# Altium PCB bunny_brain_D.PCBdoc (part 2 of 2)
Units mil, origin at the board's own origin, x right, y up, seen from the top; angles counter-clockwise.
Board outline 866.14 x 866.14 mil, 6 copper layers (Top Layer, GND1, SIG2/PWR, SIG1/PWR, GND2, Bottom Layer), stack 29.528 mil thick; 62 components, 94 nets, 390 pads, 189 vias.
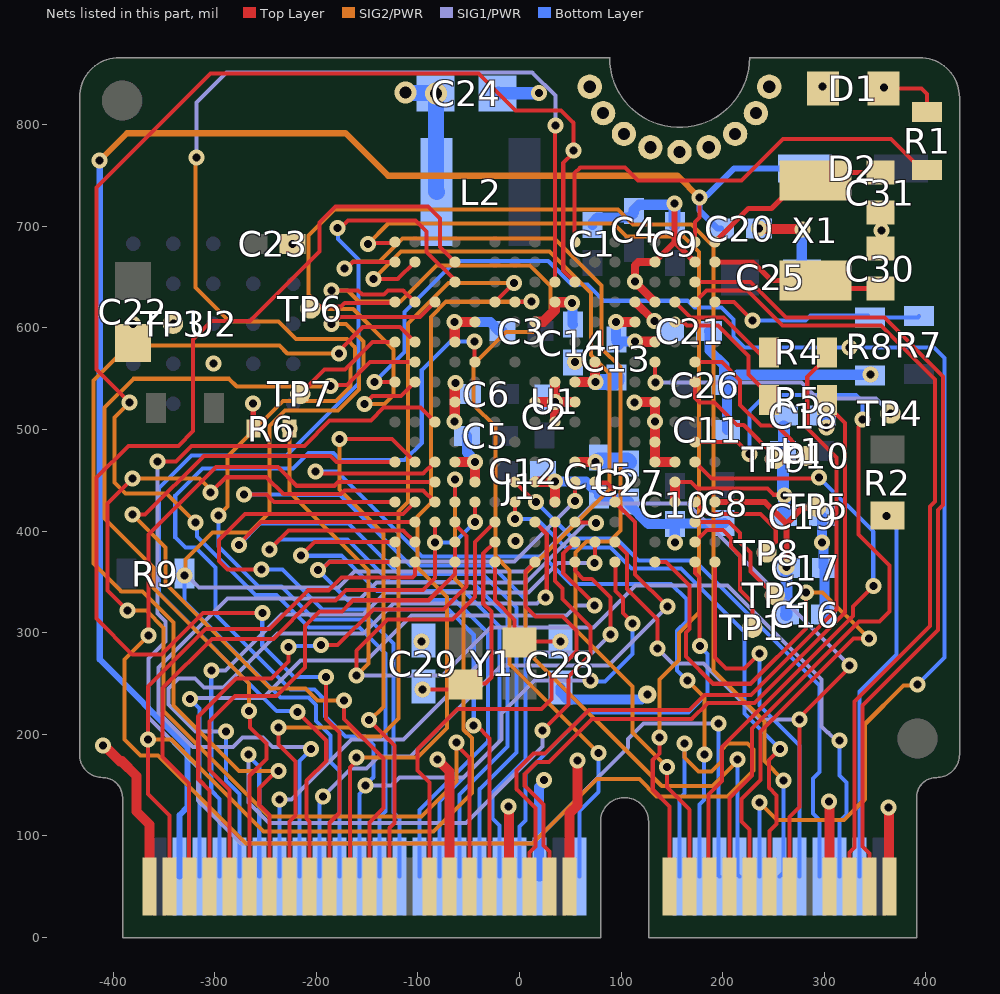
[diagram p6: the nets of this part, all layers, seen from the top]

## Via types
v1: diameter 15.75, hole 7.87, Top Layer to Bottom Layer, tented both sides, 186 vias
v2: diameter 22, hole 12, Top Layer to Bottom Layer, tented both sides, 2 vias
v3: diameter 18, hole 8, Top Layer to Bottom Layer, tented both sides, 1 vias

## Nets (pads, with @x,y where several pads share a name; then routed paths per layer and width w, separated by ;. In a path a pad name is that pad's centre, name@x,y a point inside that pad or via, vN(x,y) a via of type N, cw(c..) or ccw(c..) an arc to the next point about the centre after c; other vN are vias at no path point) (continued)
GND: C1.2 C2.1 C3.1 C4.2 C5.1 C6.1 C8.1 C9.1 C10.2 C11.1 C12.1 C13.2 C14.1 C15.1 C16.1 C17.1 C18.2 C19.1 C20.1 C21.1 C22.2 C23.2 C24.1 C25.2 C26.1 C27.1 C28.2 C29.2 C30.2 C31.2 D1.C J1.1 J1.7 J1.33 J1.36 J1.39 J1.45 J1.75 J1.SCREW R8.1 U1.D6 U1.D9 U1.D12 U1.E5 U1.E13 U1.G2 U1.H5 U1.H9 U1.H13 U1.J4 U1.J8 U1.J10 U1.J14 U1.K9 U1.N13 U1.P6 U1.P7 U1.P9 U1.P12 U1.P14 U1.P16 U1.R6 U1.T16 U2.B3 U2.C1 U2.E5 | length 2425
  Top Layer w4: v1@113.6,645.38 v1(113.6,645.57) ; U1.P14@133.28,625.51 U1.P14@133.28,625.7
  Top Layer w6: U1.P16@133.28,664.88 152.97,684.57 ; v1(152.49,722.39) 152.49,685.05 U1.T16@172.65,664.88
  Top Layer w8: v1@113.6,645.38 U1.P14@133.28,625.7 ; v1(113.6,645.57) 113.6,661.57 116.91,664.88 U1.P16@133.28,664.88
  Top Layer w10: v1(-410,189) -408.75,189 -393.2,173.45 -391.45,173.45 -377,159 -377,124.05 -364.17,111.22 J1.75@-364.17,50.2 ; v1(-223.29,682.47) -219.86,682.47 C23.2@-219.56,682.77 ; v1(-80.71,175.2) -68.9,163.39 J1.45@-68.9,50.2 ; v1(-64.2,507.77) -63.76,508.2 -63.76,526.89 U1.D9@-63.57,527.08 -63.76,527.28 -63.76,545.2 v1(-63.2,545.77) ; v1(-64.2,605.77) -63.76,605.34 -63.76,586.34 U1.D12@-63.57,586.14 ; v1@-64.06,605.63 -63.89,605.8 U1.E13@-43.91,605.8 ; U1.D6@-63.57,468.03 U1.D6@-63.57,468.03 -43.86,467.99 v1(-43.82,467.95) ; U1.E5@-43.88,448.34 v1(-43.82,467.95) ; v1(-10.9,128.89) -10.37,128.36 -10.37,50.73 J1.39@-9.84,50.2 ; U1.G2@-4.51,389.29 -4.51,389.46 v1(-3.83,390.14) ; U1.H5@15.17,448.34 15.37,448.54 34.57,448.54 v1(34.8,448.77) ; U1.H9@15.17,527.08 v1(34.86,527.08) ; U1.H13@15.17,605.83 15.37,606.02 23.32,606.02 34.66,617.36 34.66,625.31 U1.J14@34.86,625.51 35.05,625.31 51.19,625.31 v1(51.77,624.74) ; U1.J4@34.66,428.46 U1.J4@34.86,428.66 v1(34.8,448.77) ; U1.J8@34.86,507.4 v1(34.86,527.08) ; U1.J10@34.86,546.77 v1(34.86,527.08) ; J1.33@49.21,50.2 49.21,122.18 57.01,129.98 v1(57.01,174.16) ; U1.K9@54.54,527.08 v1(34.86,527.08) ; v1@94.8,604.63 95.76,605.59 v1@95.76,605.77 ; v1(94.8,605.77) v1@95.76,605.77 ; v1(113.12,526.53) 113.12,527.08 U1.P9@133.28,527.08 ; U1.N13@113.6,605.83 96.86,605.83 96.8,605.77 v1@95.76,605.77 ; v1(113.8,586.77) 114.24,586.34 133.09,586.34 U1.P12@133.28,586.14 ; U1.P9@133.28,527.08 U1.P9@133.28,527.08 ; U1.R6@152.97,468.03 U1.P6@133.28,468.03 U1.P7@133.28,487.71 v1(133.28,507.83) U1.P9@133.28,527.08 ; v1(235.8,697.77) 236.29,697.29 277.99,697.29 v1(278.47,696.8) ; v1(298.23,837.6) 299.21,836.61 D1.C@300.2,829.72 ; v1(304.8,133.77) 305.12,133.45 J1.7@305.12,50.2 ; C31.2@355.24,713.53 355.74,713.04 355.74,696.31 v1(356.23,695.82) ; v1(363.12,127.9) 363.64,127.38 363.64,50.73 J1.1@364.17,50.2
  Bottom Layer w4: C20.1@235.5,697.77 v1(235.8,697.77)
  Bottom Layer w10: v1(-380.2,603.77) U2.C1@-380.2,604.14 ; U2.B3@-301.46,564.77 v1(-301.2,564.77) ; v1(-64.2,605.77) -28.85,605.77 -19.85,596.77 C3.1@-16.9,596.77 ; C5.1@-51.9,493.77 C5.1@-51.9,493.77 -51.82,477.51 -43.82,469.51 v1(-43.82,467.95) v1@-44.25,467.52 ; C24.1@-21.69,830.77 C24.1@-20.69,831.77 ; J1.36@19.69,60.04 19.25,60.49 19.25,147.93 23.99,152.67 v1(23.99,154.84) ; v1(34.8,448.77) 34.8,448.95 65.18,448.95 ; C28.2@40.28,246.01 40.28,241.09 47.09,234.28 52.92,234.28 ; v1(51.77,624.74) 52.29,624.22 52.29,603.99 C14.1@52.8,603.47 ; 52.95,234.25 119.86,234.25 124.73,239.12 v3(125.83,239.12) ; 65.18,448.9 71.04,443.05 73.34,443.05 78.18,438.2 C15.1@78.18,435.25 81.27,432.16 104.71,432.16 C27.1@107.8,429.07 107.8,426.12 126.85,407.07 C10.2@152.8,407.07 ; C1.2@71.8,701.47 71.8,703.82 76.64,708.66 107.96,708.66 112.8,713.5 C4.2@112.8,715.17 ; v1(94.8,605.77) 94.8,588.53 C13.2@95.4,588.53 95.4,586.77 v1(113.8,586.77) v1@112.27,585.24 ; C13.2@97.8,583.39 C13.2@97.8,585.32 ; C4.2@112.16,715.81 117.64,721.29 151.39,721.29 v1(152.49,722.39) v1@152.64,722.23 ; C9.1@152.64,701.63 C9.1@152.8,701.47 ; v1(152.8,389) C10.2@152.8,407.07 ; C21.1@186.5,596.77 186.98,596.29 186.98,577.79 201.5,563.26 C26.1@201.5,543.77 204.14,541.13 C11.1@204.14,499.77 ; C8.1@201.8,408.07 201.3,407.57 153.3,407.57 C10.2@152.8,407.07 ; C26.1@204.46,543.77 214.64,553.95 344.98,553.95 v1(345.23,554.19) ; C25.2@277.83,649.77 277.83,695.01 278.47,695.65 v1(278.47,696.8) ; C19.1@297.87,414.77 297.87,388.83 v1(297.8,388.77) 299.15,387.42 299.15,365.12 C17.1@300.5,363.77 300.18,363.45 300.18,318.09 C16.1@299.87,317.77 ; C18.2@298.5,513.77 301.18,511.09 301.18,502.95 v1(302.18,501.95)
  Bottom Layer w12: C24.1@-20.69,831.77 -19.8,830.88 18.89,830.88 v1(19,831) ; C9.1@152.64,701.63 v1@152.64,722.23
  other v1: -96.53,291.29
NetC28_1: C28.1 U1.F1 Y1.3 | length 126.5
  Top Layer w4: U1.F1@-24.2,369.6 -24.2,332.15 -4.74,312.69 -4.74,299.9 Y1.3@0.91,294.24 ; Y1.3@-0.07,290.31 0.91,291.29 v1(40.28,291.29)
NetC29_1: C29.1 U1.F2 Y1.1 | length 221.3
  Top Layer w4: v1(-95.54,243.95) -58.24,243.95 -61,250 -52.24,249.95 -33.54,249.95 -27.63,255.86 -27.63,320.82 -35.71,328.9 -35.71,377.78 U1.F2@-24.2,389.29
NetC30_1: C30.1 U1.U16 X1.2 | length 230.6
  Top Layer w4: X1.2@299.14,638.73 X1.2@301.05,636.82
  Top Layer w5: U1.U16@192.34,664.88 229.68,664.88 247.96,646.6 X1.2@291.27,646.6 299.14,638.73 C30.1@355.24,638.73 X1.2@301.05,638.73
NetC31_1: C31.1 U1.U17 X1.1 | length 191.2
  Top Layer w5: U1.U17@192.34,684.57 225.24,717.47 247.96,717.47 275.52,745.03 X1.1@291.27,745.03 299.14,752.9 C31.1@355.24,752.9
NetD1_A: D1.A R1.1 | length 65.3
  Top Layer w4: D1.A@358.27,835.63 395.67,835.63 401.24,830.06 R1.1@401.24,812.49 ; D1.A@358.74,834.17 v1(358.74,836.63)
NetJ1_4: J1.4 R2.1 | length 373.9
  Bottom Layer w4: J1.4@334.65,60.04 334.65,242.16 370.99,278.49 370.99,404.93 v1(361.13,414.79)
NetR4_2: R4.2 U1.R14 | length 119
  Top Layer w4: U1.R14@152.97,625.51 168.29,610.19 200.72,610.19 237.6,573.3 249.59,573.3 R4.2@250.12,572.77
NetR5_2: R5.2 U1.R13 | length 138
  Top Layer w4: U1.R13@152.97,605.83 161.34,605.83 164.98,602.19 195.38,602.19 225.18,572.39 225.18,554.35 237.79,541.73 237.79,536.79 R5.2@245.64,528.95
NetR6_2: R6.2 U2.A4 | length 25.1
  Top Layer w4: v1@-262.04,525.61 v1@-261.91,525.49
  Top Layer w5: v1(-262.2,525.77) -262.04,525.61 -262.04,501.09 R6.2@-261.88,500.94
NetR7_1: R7.1 R8.2 U1.U14 | length 211.7
  Top Layer w4: U1.U14@192.34,625.51 211.1,625.51 v1(229.33,607.28)
  Bottom Layer w4: v1(229.33,607.28) 281.5,607.28 286.42,612.2 342.91,612.2 R8.2@344.8,610.31 392,610.31 R7.1@393.18,611.49
NetTP1_1: TP1.1 U1.T2 | length 140.4
  Top Layer w4: U1.T2@172.65,389.29 184.34,400.97 200.18,400.97 208.18,392.97 208.18,384.76 217.18,375.76 217.18,341.95 229.18,329.95 TP1.1@229.18,304.95
NetTP2_1: TP2.1 U1.T3 | length 124.5
  Top Layer w4: U1.T3@172.65,408.97 206.16,408.97 217.18,397.95 217.18,388.95 227.18,378.95 227.18,360.32 250.55,336.95 TP2.1@251.18,336.95
NetTP3_1: TP3.1 U2.C2 | length 0.7
  Top Layer w5: v1(-340.62,604.28) -340.2,604.71 TP3.1@-340.2,604.77
NetTP4_1: TP4.1 U1.P11 | length 264.7
  Top Layer w4: U1.P11@133.28,566.45 133.28,546.71 v1(133.79,546.21) ; TP4.1@365.09,515.7 365.09,515.86 v1(365.18,515.95)
  SIG1/PWR w4: v1(133.79,546.21) 277.49,546.21 293.24,530.46 350.67,530.46 v1(365.18,515.95)
NetTP7_1: TP7.1 U1.A12 | length 114.4
  Top Layer w4: TP7.1@-215.82,534.95 -191.82,558.95 -171.82,558.95 -144.63,586.14 U1.A12@-122.62,586.14
NetTP8_1: TP8.1 U1.T4 | length 117.3
  Top Layer w4: U1.T4@172.65,428.66 184.34,416.97 237.16,416.97 252.18,401.95 252.18,389.26 243.18,380.26 TP8.1@243.18,378.95
NetTP9_1: TP9.1 U1.T10 | length 120.9
  Top Layer w4: U1.T10@172.65,546.77 172.65,530.97 177.09,526.53 191.86,526.53 213.95,504.43 220.7,504.43 251.18,473.95 TP9.1@251.18,470.95
P0-2: J1.16 U1.B16 | length 1075.1
  Top Layer w4: v1(-143.82,647.95) -119.87,647.95 U1.B16@-102.94,664.88
  SIG2/PWR w4: v1(-143.82,647.95) -116.62,675.15 29.46,675.15 70.18,634.42 70.18,573.4 88.68,554.9 88.68,441.06 5.83,358.22 5.83,283.17 140,149 189.75,149 214.4,173.65 v1(214.4,175.15)
  Bottom Layer w4: v1(214.4,175.15) 214.4,62.18 J1.16@216.54,60.04
P0-4/CTIMER0-MAT2: J1.32 U1.B14 | length 1023.5
  Top Layer w4: v1(-185.11,636.76) -158.8,636.76 -154.76,632.73 -133.6,632.73 -129.31,637.02 -114.45,637.02 U1.B14@-102.94,625.51
  SIG2/PWR w4: v1(-185.11,636.76) -169.06,636.76 -158.23,625.94 -117.2,625.94 -81.76,661.37 10.23,661.37 30.51,641.09 30.51,613.19 13.09,595.77 -13.5,595.77 -45.2,564.08 -45.2,524.33 -23.82,502.95 -23.82,375.45 -9.82,361.45 -9.82,269.39 v1(77.8,181.77) v1@77.8,184.95
  Bottom Layer w4: J1.32@59.06,60.04 59.06,124.71 77.8,143.45 v1(77.8,181.77)
P0-5: TP6.1 U1.A14 | length 88
  Top Layer w4: TP6.1@-208.73,621.01 -175.76,621.01 -172.04,624.73 -123.4,624.73 U1.A14@-122.62,625.51
P0-6: J1.11 J1.56 R9.1 U1.C14 U1.M2 | length 2181.9
  Top Layer w4: v1@-329.8,357.23 -329.8,358.22 v1@-327.65,360.36 ; v1(-184.82,603.95) -183.6,603.95 -176.6,610.95 -97.81,610.95 U1.C14@-83.25,625.51 ; U1.M2@93.91,389.29 105.77,377.43 105.77,342.93 135.75,312.94 v1(135.75,284.4) ; J1.11@265.75,50.2 265.75,118.73 275.52,128.5 275.52,216.47 325.01,265.97 v1(325.01,267.51)
  SIG2/PWR w4: v1@-329.8,358.22 -328.72,359.3 -328.72,372.09 -302.24,398.57 -265.82,398.57 -246.13,418.26 -246.13,503.4 -230.88,518.65 -178.74,518.65 -157.82,539.57 -157.82,556.95 -153.54,561.23 -153.54,586.61 -170.88,603.95 v1(-184.82,603.95)
  SIG1/PWR w4: v1(-329.8,356.25) -327.39,356.25 -315.63,344.49 -178.15,344.49 -162.4,360.24 5.88,360.24 72.81,427.17 165.35,427.17 v1(325.01,267.51) ; v1(135.75,284.4) 150.42,269.73 180.94,269.73 236.15,214.52 v1(275.52,214.52)
  Bottom Layer w4: R9.1@-326.14,354.56 R9.1@-329.8,358.22 v1(-329.8,356.25) -329.8,330.66 -235.18,236.05 -207.47,236.05 -200.2,228.77 -200.2,212.99 -186.1,198.89 -186.1,172.67 -177.17,163.74 J1.56@-177.17,60.04
P0-10: J1.63 U1.B12 | length 973.9
  Top Layer w4: J1.63@-246.06,50.2 -246.06,120.63 -256.2,130.77 -256.2,146.74 -239.17,163.77 v1(-237.2,163.77) ; v1(-177.82,574.95) -177.82,577.43 -154.3,600.95 -117.75,600.95 U1.B12@-102.94,586.14
  SIG2/PWR w4: v1(-237.2,163.77) -276.2,163.77 -340.62,228.2 -340.62,309.99 -371.18,340.55 -391.98,340.55 -419.36,367.94 -419.36,548.18 -384.91,582.63 -236.29,582.63 -228.62,574.95 v1(-177.82,574.95)
P0-11: J1.65 U1.B11 | length 874.7
  Top Layer w4: v1(-266.2,222.77) -265.09,221.66 -265.09,206.66 -249.2,190.77 -249.2,175.77 -265.75,159.22 J1.65@-265.75,50.2 ; v1(-185.82,542.95) -184.95,543.83 -169.95,543.83 -147.32,566.45 U1.B11@-102.94,566.45
  SIG2/PWR w4: v1(-266.2,222.77) -266.2,249.91 -360.31,344.02 -360.31,364.25 -408.54,412.47 -408.54,521.54 -380.13,549.95 -285.88,549.95 -278.32,542.39 -186.38,542.39 v1(-185.82,542.95)
P0-14: J1.54 U1.E11 U1.M1 | length 1348.1
  Top Layer w4: v1(-44.2,586.77) -44.2,566.77 U1.E11@-43.88,566.45 ; U1.M1@93.91,369.6 94.34,369.17 94.34,341.06 101.91,333.49 101.91,319.39 111.15,310.15 v1(111.15,309.01)
  SIG1/PWR w4: v1(-151.67,149.56) -126.03,149.56 -118.11,157.48 -55.14,157.48 -17.79,194.83 -17.79,220.4 14.71,252.9 v1(69.81,252.9)
  Bottom Layer w4: J1.54@-157.48,60.04 -157.48,141.34 -151.67,147.15 -151.67,149.8 -143.7,157.77 -143.7,189.27 -152.21,197.79 -171.33,197.79 -191.2,217.65 -191.2,233.4 -201.84,244.05 -225.47,244.05 -299.28,317.86 -299.28,364.12 -318.97,383.81 -328.81,383.81 -338.82,393.82 -338.82,434.95 -312,461.77 -222.89,461.77 -207.71,476.95 -183,476.95 -176,469.95 -113.02,469.95 -96.2,486.77 -96.2,558.57 -68,586.77 v1(-44.2,586.77) ; v1(69.81,252.9) 70.79,251.92 84.15,251.92 111.15,278.92 v1(111.15,309.01)
P0-16/FC0-I2C-SDA: J1.12 U1.B10 | length 1375.8
  Top Layer w4: v1(-152.82,524.95) -144.69,533.08 -116.63,533.08 U1.B10@-102.94,546.77
  SIG2/PWR w4: v1(-152.82,524.95) -132.82,524.95 -123.82,533.95 -123.82,578.95 -163.64,618.77 -193.69,618.77 -207.75,632.83 -207.75,691.01 -182.22,716.54 97.04,716.54 111.85,701.72 169.34,701.72 190.94,680.12 190.94,262.8 241.14,212.6 241.14,173.63 v1(260,154.77)
  Bottom Layer w4: J1.12@255.91,60.04 260,64.13 v1(260,154.77)
P0-17/FC0-I2C-SCL: J1.14 U1.A10 | length 1369.1
  Top Layer w4: v1(-142.82,546.95) -142.73,546.86 -122.71,546.86 U1.A10@-122.62,546.77
  SIG2/PWR w4: v1(236.22,132.87) 253.32,115.77 319.49,115.77 339.8,136.08 339.8,209.9 377.86,247.96 390.68,247.96 v1(391.73,249.02)
  Bottom Layer w4: v1(-142.82,546.95) -113.41,576.36 -113.41,615.55 -63.2,665.77 28.27,665.77 51.27,642.77 66.8,642.77 82.8,626.77 165.35,626.77 172.05,620.08 198.82,620.08 210.63,608.27 210.63,591.54 221.4,580.77 v1(324.8,580.77) 407.8,580.77 418.31,570.26 418.31,275.59 v1(391.73,249.02) ; J1.14@236.22,60.04 v1(236.22,132.87)
P0-20: J1.18 U1.C8 | length 1399.7
  Top Layer w4: v1(-356.37,468.45) -338.32,468.45 -322.82,483.95 -211.82,483.95 -186.82,508.95 -146.32,508.95 -133.67,521.6 -97.46,521.6 U1.C8@-83.25,507.4
  SIG1/PWR w4: v1(-356.37,468.45) -356.37,318.97 -348.5,311.1 -348.5,291.29 -365.23,274.56 -365.23,216.61 -316.2,167.58 -316.2,134.77 -274.2,92.77 12.77,92.77 106.8,186.8 106.8,195.38 122.19,210.77 v1(195.8,210.77)
  Bottom Layer w4: v1(195.8,210.77) 195.8,176.06 195.89,175.97 195.89,61 J1.18@196.85,60.04
P0-24/FC1-I2C-SDA: J1.51 U1.B6 | length 561
  Top Layer w4: v1(-177.2,490.77) -125.68,490.77 U1.B6@-102.94,468.03 ; v1(-148.09,213.97) -123.2,189.08 -123.2,112.77 -127.95,108.02 J1.51@-127.95,50.2
  SIG2/PWR w4: v1(-177.2,490.77) -177.2,440.86 -133.93,397.59 -133.93,227.04 -146.99,213.97 v1(-148.09,213.97)
P0-25/FC1-I2C-SCL: J1.53 U1.A6 | length 794.7
  Top Layer w4: v1(-380.98,416.29) -368.48,416.29 -310.77,474 -186.21,474 -180.24,468.03 U1.A6@-122.62,468.03 ; v1(-172.58,233.31) -172.58,215.15 -133.69,176.27 -133.69,127.27 -147.64,113.33 J1.53@-147.64,50.2
  SIG2/PWR w4: v1(-380.98,416.29) -348.5,383.81 -348.5,348.38 -245.15,245.03 -210.7,245.03 -198.98,233.31 v1(-172.58,233.31)
P1-4: J1.40 U1.A4 | length 760.4
  Top Layer w4: v1(-271.2,435.91) -248.91,435.91 -241.66,428.66 U1.A4@-122.62,428.66
  Bottom Layer w4: v1(-271.2,435.91) -222.93,435.91 -222.79,435.77 -176.91,435.77 -107.09,365.95 -27.49,365.95 5.96,332.5 5.96,175.27 -26.57,142.74 -26.57,117.13 -19.69,110.24 J1.40@-19.69,60.04
P1-5: J1.42 U1.B3 | length 779.4
  Top Layer w4: v1(-276.19,386.3) -276.19,387.22 -254.61,408.8 -103.11,408.8 U1.B3@-102.94,408.97
  Bottom Layer w4: v1(-276.19,386.3) -254.72,407.77 -168.6,407.77 -118.78,357.95 -36.22,357.95 -3.02,324.75 -3.02,182.26 -39.37,145.91 J1.42@-39.37,60.04
P1-6: J1.44 U1.B2 | length 700.7
  Top Layer w4: v1(-246.2,381.77) -227.17,400.8 -114.45,400.8 U1.B2@-102.94,389.29
  Bottom Layer w4: v1(-246.2,381.77) -236.2,391.77 -169.2,391.77 -127.38,349.95 -46.92,349.95 -11.76,314.79 -11.76,188.07 -59.06,140.77 J1.44@-59.06,60.04
P1-7: J1.46 U1.A2 | length 592.9
  Top Layer w4: v1(-215.2,375.77) -201.68,389.29 U1.A2@-122.62,389.29
  Bottom Layer w4: v1(-215.2,375.77) -175.1,375.77 -140.28,340.95 -54.65,340.95 -19.76,306.05 -19.76,192.86 -78.74,133.88 J1.46@-78.74,60.04
P1-8: J1.48 U1.A1 U1.K5 | length 840.1
  Top Layer w4: v1(-198.34,361.52) -195.16,361.52 -187.07,369.6 U1.A1@-122.62,369.6 ; U1.K5@54.54,448.34 v1(54.54,429.59) v1@55.18,428.95
  SIG1/PWR w4: v1(-198.34,361.52) -195.58,361.52 -187.15,369.95 -5.1,369.95 v1(54.54,429.59)
  Bottom Layer w4: v1(-198.34,361.52) -168.77,331.95 -63.37,331.95 -31.18,299.76 -31.18,192.75 -98.43,125.51 J1.48@-98.43,60.04
P1-9: J1.73 U1.B1 U1.D4 | length 1236.3
  Top Layer w4: J1.73@-344.49,50.2 -344.49,119.89 -365.82,141.22 v1(-365.82,194.95) -365.82,246.95 -309,303.77 -246,303.77 -208,341.77 -188,341.77 -175.24,354.53 -105.28,354.53 -102.94,356.88 U1.B1@-102.94,369.6 ; U1.D4@-63.57,428.66 v1(-63.57,450.64)
  SIG2/PWR w4: v1(-365.82,194.95) -342.59,194.95 -251.97,104.33 -84.75,104.33 -46.82,142.26 -46.82,196.32 -54.99,204.5 -54.99,344.36 -63.57,352.94 v1(-63.57,450.64)
P1-10: J1.71 U1.C3 U1.E4 | length 641.7
  Top Layer w4: J1.71@-324.8,50.2 -325.2,50.6 -325.2,151.56 -351.2,177.56 -351.2,245.57 -302.84,293.93 -242.35,293.93 -204.51,331.77 -181,331.77 -170.82,341.95 -95.08,341.95 -83.25,353.78 v1(-83.25,388.95) U1.C3@-83.25,408.97 ; v1@-43.86,408.99 U1.E4@-43.88,428.66
  Bottom Layer w4: v1(-83.25,388.95) -63.84,388.95 v1(-43.83,408.96)
P1-11: J1.69 U1.D3 | length 565.5
  Top Layer w4: J1.69@-305.12,50.2 -305.12,144.72 -316.2,155.8 -316.2,217.77 -279.2,254.77 -244.25,254.77 -227.2,271.82 v1(-227.2,285.74) ; v1(-195.2,287.77) -179,287.77 -143.82,322.95 -74.82,322.95 -52.06,345.71 -52.06,395.19 -60.57,403.7 -60.57,404.07 -63.57,407.07 U1.D3@-63.57,408.97
  Bottom Layer w4: v1(-227.2,285.74) -226.18,286.75 -196.21,286.75 v1(-195.2,287.77)
P1-12: J1.67 U1.D1 U1.D2 | length 528.2
  Top Layer w4: J1.67@-285.43,50.2 -285.43,145 -305.2,164.77 -305.2,212.77 -280.2,237.77 -238.98,237.77 -211.2,265.56 -211.2,306.8 -197,321 -174.77,321 -163.82,331.95 -89.33,331.95 -63.57,357.71 U1.D2@-63.57,389.29
P1-18: J1.13 U1.G4 | length 563.8
  Top Layer w4: U1.G4@-4.51,428.66 -4.36,428.51 -4.36,412.29 v1(-4.2,412.13) ; J1.13@246.06,50.2 246.06,104.99 252.8,111.73 252.8,139.98 245.35,147.43 245.35,174.83 v1(256.3,185.77)
  Bottom Layer w4: v1(-4.2,412.13) 17,412.13 45.36,383.77 89.66,383.77 110.36,363.06 159.07,363.06 221.38,300.75 221.38,220.69 v1(256.3,185.77)
P1-19: J1.8 U1.G5 | length 576
  Top Layer w4: U1.G5@-4.51,448.34 15.06,428.77 v1(16.35,428.77)
  Bottom Layer w4: v1(16.35,428.77) 52.4,392.72 95.35,392.72 117.01,371.06 172.07,371.06 295.28,247.86 295.28,163.11 288.8,156.64 288.8,121.94 295.28,115.46 J1.8@295.28,60.04
P1-21/MCLK: J1.58 U1.L5 U1.M4 | length 654.8
  Top Layer w4: U1.L5@74.23,448.34 74.97,447.6 85.74,447.6 93.17,440.17 93.17,429.4 113.77,408.8 113.77,357.47 v1(145.5,325.74)
  SIG1/PWR w4: v1(-193.2,138.77) -165.63,166.34 -150.59,166.34 -138.83,178.1 -107.36,178.1 -17.74,267.72 87.48,267.72 v1(145.5,325.74)
  Bottom Layer w4: J1.58@-196.85,60.04 -196.85,131.94 -193.2,135.59 v1(-193.2,138.77)
P2-1: J1.47 U1.H1 | length 477.7
  Top Layer w4: J1.47@-88.58,50.2 -88.58,152.43 -100.47,164.32 -100.47,185.31 -60.82,224.95 21.59,224.95 31.42,234.79 31.42,256.84 56.03,281.45 56.03,302.12 42.25,315.9 15.68,315.9 5.83,325.74 5.83,360.27 U1.H1@15.17,369.6
P2-2/SD-D1: J1.66 U1.H3 | length 726.8
  Top Layer w4: U1.H3@15.17,408.97 26.8,397.34 26.8,335.97 v1(25.52,334.69)
  SIG1/PWR w4: v1(-288.82,202.95) -319.09,202.95 -345.47,229.33 -345.47,245.08 -335.63,254.92 -319.24,254.92 -310.34,246.01 -291.41,246.01 -238.21,299.21 -153.54,299.21 -124.02,328.74 17.3,328.74 23.25,334.69 v1(25.52,334.69)
  Bottom Layer w4: v1(-288.82,202.95) -288.82,154.42 -275.59,141.19 J1.66@-275.59,60.04
P2-3/SD-D0: J1.64 U1.J3 | length 755.5
  Top Layer w4: v1(22.57,203.69) 48.16,229.28 48.16,256.84 69.81,278.49 69.81,305.76 42.25,333.32 42.25,343.46 34.86,350.85 U1.J3@34.86,408.97
  SIG1/PWR w4: v1(-266.82,179.95) -266.82,132.82 -246.77,112.77 -52.61,112.77 22.57,187.94 v1(22.57,203.69)
  Bottom Layer w4: v1(-266.82,179.95) -266.82,178.75 -256.2,168.12 -256.2,60.33 J1.64@-255.91,60.04
P2-4/SD-CLK: J1.60 U1.K3 | length 858.4
  Top Layer w4: U1.K3@54.54,408.97 55.14,408.37 74.84,408.37 v1(75.44,407.77)
  SIG1/PWR w4: v1(-205.2,185.77) -207.09,187.66 -243.3,187.66 -252.59,196.95 -272.54,196.95 -281.93,187.56 -321.42,187.56 -355.39,221.53 -355.39,265.58 -287.31,333.66 -156.5,333.66 -140.75,349.41 6.37,349.41 64.27,407.31 74.98,407.31 v1(75.44,407.77)
  Bottom Layer w4: J1.60@-216.54,60.04 -216.54,173.78 -205.2,185.12 v1(-205.2,185.77)
P2-5/SD-CMD: J1.62 U1.K1 | length 559.6
  Top Layer w4: U1.K1@54.54,369.6 54.54,361.03 62.6,352.97 71.12,352.97 89.5,334.6 v1(89.5,298.18)
  SIG1/PWR w4: v1(-236.2,135.77) -224.47,135.77 -165.4,194.83 -114.25,194.83 -28.57,280.51 71.83,280.51 v1(89.5,298.18)
  Bottom Layer w4: J1.62@-236.2,60.06 v1(-236.2,135.77)
P2-6/SD-D3: J1.70 U1.K2 | length 694.5
  Top Layer w4: U1.K2@54.54,389.29 43.03,377.78 43.03,358.95 73.65,328.33 v1(73.65,326.72)
  SIG1/PWR w4: v1(-324.2,234.77) -323.2,235.77 -252.44,235.77 -215.62,272.59 -150.66,272.59 -106.37,316.88 46.19,316.88 56.03,326.72 v1(73.65,326.72)
  Bottom Layer w4: v1(-324.2,234.77) -314.96,225.53 J1.70@-314.96,60.04
P2-7/SD-D2: J1.68 U1.L2 | length 647.7
  Top Layer w4: v1(73.8,368.77) 74.23,369.2 U1.L2@74.23,389.29
  SIG1/PWR w4: v1(-303.2,262.77) -289.42,262.77 -234.27,317.91 -153.54,317.91 -131.89,339.57 8.86,339.57 38.06,368.77 v1(73.8,368.77)
  Bottom Layer w4: v1(-303.2,262.77) -303.41,262.56 -303.41,245.77 -303.41,144.54 -295.2,136.33 J1.68@-295.2,60.12
P3-2/LPSPI7-MOSI: J1.59 U1.D15 | length 1038.7
  Top Layer w4: v1(-218.69,222.17) -190.2,193.68 -190.2,173.77 -209.65,154.32 -209.65,117.13 -206.69,114.17 J1.59@-206.69,50.2 ; v1(-179.34,698.57) -176.16,698.57 -168.96,705.77 -102.2,705.77 -91.43,695 -91.43,674.95 -63.57,647.1 U1.D15@-63.57,645.2
  Bottom Layer w4: v1(-218.69,222.17) -219.62,223.1 -238.97,223.1 -354.82,338.95 -354.82,442.45 -322.91,474.36 -229.38,474.36 -158.44,545.3 -158.44,667.18 -178.59,687.33 -178.59,697.83 v1(-179.34,698.57)
P3-3/LPSPI7-SCK: J1.57 U1.D16 | length 1228.9
  Top Layer w4: v1(-253.2,319.61) -311.36,319.61 -352.2,278.77 -381.2,278.77 -416.33,313.9 -416.33,452.64 -385.02,483.95 -335.82,483.95 -321.2,498.57 -321.2,588.77 -303.2,606.77 -265.3,606.77 -196.92,675.15 -196.92,703.69 -181.17,719.44 -89.87,719.44 -78.2,707.77 -78.2,679.51 U1.D16@-63.57,664.88 ; v1(-190.45,256.52) -190.45,214.93 -177.17,201.65 -177.17,122.8 -187.01,112.96 J1.57@-187.01,50.2
  Bottom Layer w4: v1(-253.2,319.61) -253.2,287.53 -222.19,256.52 v1(-190.45,256.52)
P3-4/LPSPI7-MISO: J1.61 U1.F14 | length 835.5
  Top Layer w4: v1(-237.2,206.77) -237.2,189.77 -220.47,173.04 -220.47,120.08 -226.38,114.17 J1.61@-226.38,50.2 ; U1.F14@-24.2,625.51 -24.08,625.51 -5.32,644.27 v1(-5.2,644.27)
  SIG2/PWR w4: v1(-237.2,206.77) -166.98,206.77 -158.05,197.83 -136.81,197.83 -119.09,215.55 -119.09,419.32 -109.82,428.6 -109.82,604.15 -69.7,644.27 v1(-5.2,644.27)
P3-5/LPSPI7-CS: J1.55 U1.G14 | length 774.2
  Top Layer w4: J1.55@-167.32,50.2 -166.96,50.55 -166.96,167.49 -160.28,174.17 v1(-160.28,177.35) ; U1.G14@-4.51,625.51 -4.38,625.64 11.67,625.64 v1(11.8,625.77)
  SIG2/PWR w4: v1(-160.28,177.35) -100.62,177.35 -71.57,206.4 -71.57,335.35 -100.39,364.17 -100.39,414.37 -87.2,427.57 -87.2,610.77 -72.2,625.77 v1(11.8,625.77)
P3-16/SAI1-TX-BCLK: J1.50 U1.J15 | length 1648.8
  Top Layer w4: U1.J15@34.86,645.2 35.03,645.37 35.03,798.83 v1(35.36,799.16)
  SIG2/PWR w4: v1(-317.99,767.67) -317.99,766.68 -318.97,765.7 -318.97,639.71 -285.5,606.25 -237.28,606.25 -219.98,588.95 -169.82,588.95 -161.82,580.95 -161.82,568.4 -166.34,563.88 -166.34,542.37 -180.75,527.95 -232.9,527.95 -287.47,473.38 -287.47,424.16 v1(-296.33,415.31)
  SIG1/PWR w4: v1(-317.99,767.67) -317.99,821.8 -288.24,851.55 12.5,851.55 35.36,828.69 v1(35.36,799.16)
  Bottom Layer w4: v1(-296.33,415.31) -296.33,384.78 -256.97,345.42 -234.32,345.42 -201.97,313.07 -147.84,313.07 -124.02,289.25 -124.02,123.03 -118.11,117.12 J1.50@-118.11,60.04
P3-17/SAI1-TX-FS: J1.52 U1.K15 | length 1578.2
  Top Layer w4: v1(-383.93,526.53) -416.41,559.01 -416.41,738.12 -304.13,850.39 -40.39,850.39 -4,814 41,814 53.08,801.92 v1(53.08,774.56) ; v1@52.19,775.44 v1(53.08,774.56) ; U1.K15@54.54,645.2 43.03,656.71 43.03,762.16 53.08,772.2 v1(53.08,774.56)
  SIG2/PWR w4: v1(-383.93,526.53) -398.57,511.89 -398.57,447.79 -387.74,436.96 -347.51,436.96 v1(-318.97,408.42)
  Bottom Layer w4: v1(-318.97,408.42) -317.4,406.85 -317.4,394.54 -259.86,337 -239,337 -207.07,305.07 -157.55,305.07 -132.02,279.53 -132.02,123.89 -137.8,118.11 J1.52@-137.8,60.04
P3-19/GREEN-LED: R1.2 U1.K17 | length 451.9
  Top Layer w4: U1.K17@54.54,684.57 54.3,684.81 54.3,752.27 59.8,757.77 103.8,757.77 116.54,745.03 218.43,745.03 259.35,785.95 365.62,785.95 388.32,763.25 393.4,763.25 R1.2@401.24,755.41
P4-0: J1.15 U1.P1 | length 691
  Top Layer w4: U1.P1@133.28,369.6 144.05,369.6 167.38,346.28 167.38,303.72 163.68,300.03 163.68,276.58 190.49,249.77 227.41,249.77 281.78,304.15 v1(281.78,339.49) ; J1.15@226.38,50.2 226.38,106.18 218.43,114.13 218.43,136.32 237.35,155.24 237.35,202.9 328.79,294.34 343.54,294.34 v1(343.75,294.13)
  SIG2/PWR w4: v1(281.78,339.49) 298.4,339.49 v1(343.75,294.13)
P4-2/DAC0: J1.38 U1.T1 | length 450.1
  Top Layer w4: U1.T1@172.65,369.6 172.65,358.72 177.09,354.28 177.09,287.61 v1(177.55,287.15)
  Bottom Layer w4: J1.38@0,60.04 0,109.25 5.91,115.16 5.91,161.4 65.96,221.46 166.32,221.46 184.97,240.11 184.97,278.94 177.55,286.35 v1(177.55,287.15)
P4-3/DAC1: J1.10 U1.U1 | length 384.1
  Top Layer w4: U1.U1@192.34,369.6 192.34,275.77 203.4,264.71 221.38,264.71 v1(236.15,279.48)
  Bottom Layer w4: v1(236.15,279.48) 236.15,228.42 275.59,188.98 J1.10@275.59,60.04
P4-12/FC2-RX: J1.19 U1.T6 | length 621.5
  Top Layer w4: U1.T6@172.65,468.03 188.96,451.72 293.75,451.72 v1(294.8,452.77) ; J1.19@187.01,50.2 186.18,51.03 186.18,140.95 199.18,153.95 199.18,187.36 328.18,316.36 328.18,325.95 v1(348.18,345.95)
  Bottom Layer w4: v1(294.8,452.77) 348.18,399.39 v1(348.18,345.95)
P4-13/FC2-TX: J1.17 U1.T7 | length 789.7
  Top Layer w4: U1.T7@172.65,487.71 214.42,487.71 v1(226.18,475.95) ; J1.17@206.69,50.2 206.69,137.46 228.85,159.62 228.85,205.72 334.16,311.02 354.33,311.02 364.17,320.87 364.17,365.96 333.66,396.47 333.66,502.75 337.53,506.61 v1(337.53,509.79)
  Bottom Layer w4: v1(226.18,475.95) 226.18,518.15 241.98,533.95 330.99,533.95 337.53,527.41 v1(337.53,509.79)
P4-21: TP10.1 U1.T11 | length 162.6
  Top Layer w4: U1.T11@172.65,566.45 199.17,566.45 217.18,548.45 217.18,524.32 237.55,503.95 253.18,503.95 282.18,474.95 TP10.1@282.18,473.95
PIO1-0/FC3-RX: J1.20 U1.C6 | length 833.3
  Top Layer w4: v1(-200.86,458.61) -198.76,456.52 -94.76,456.52 U1.C6@-83.25,468.03
  SIG2/PWR w4: v1(165.28,252.9) 182.01,236.17 182.01,180.16 v1(181.93,180.07)
  Bottom Layer w4: v1(-200.86,458.61) -179.48,458.61 -95.82,374.95 23.67,374.95 50.67,347.95 149.18,347.95 164.18,332.95 164.18,310.95 155.18,301.95 155.18,263.01 v1(165.28,252.9) v1@165.28,256.08 ; J1.20@177.17,60.04 177.17,130.94 181.69,135.45 181.69,179.83 v1(181.93,180.07)
PIO1-1/FC3-TX: J1.22 U1.C5 | length 1496.9
  Top Layer w4: v1(-365.23,297.2) -365.23,396.54 -298.77,463 -237.73,463 -219.39,444.66 -182.31,444.66 -178.62,448.34 U1.C5@-83.25,448.34
  SIG2/PWR w4: v1(-365.23,297.2) -388.85,273.57 -388.85,213.53 -388.85,194.85 -373.08,179.08 -355.95,179.08 -269.39,92.52 12.77,92.52 76.25,156 118,156 135,139 204.92,139 230.24,164.32 230.24,184.99 224.34,190.9 204.9,190.9 198.75,184.75 198.75,173.29 188.79,163.34 176.11,163.34 162.33,177.12 v1(162.33,190.9)
  Bottom Layer w4: J1.22@157.48,60.04 157.48,136.84 162.33,141.68 v1(162.33,190.9)
PIO1-2/CAN-TX: J1.43 U1.C4 | length 1128.5
  Top Layer w4: v1(-385.9,321.8) -405.58,341.49 -405.58,427.12 -381.07,451.63 v1(-381.07,452.03) ; v1(-304.21,437.94) -289.15,453 -248.87,453 -232.53,436.66 -175.78,436.66 -172.27,440.17 -94.76,440.17 U1.C4@-83.25,428.66 ; v1(-61.93,191.73) -61.93,189.27 -49.21,176.55 J1.43@-49.21,50.2
  SIG2/PWR w4: v1(-385.9,321.8) -367.21,321.81 -350.2,304.8 -350.2,222.77 -246.38,118.95 -96.62,118.95 -61.93,153.64 v1(-61.93,191.73) ; v1(-381.07,452.03) -380.81,451.77 -315.08,451.77 -304.21,440.9 v1(-304.21,437.94)
PIO1-3/CAN-RX: J1.41 U1.B4 | length 765.9
  Top Layer w4: v1(-254.01,362.16) -287.58,362.16 -295.82,370.39 -295.82,391.21 -270.23,416.8 -114.8,416.8 U1.B4@-102.94,428.66 ; v1(-45.06,208.61) -42.06,208.61 -29.53,196.08 J1.41@-29.53,50.2
  Bottom Layer w4: v1(-254.01,362.16) -233.34,362.16 -194.13,322.95 -70.12,322.95 -45.06,297.89 v1(-45.06,208.61)
RESET-b: J1.6 R6.1 U1.F3 | length 1267.6
  Top Layer w4: R6.1@-226.45,500.94 -226.31,501.08 v1(-226.17,501.08) ; v1(-160.5,257.83) -160.5,282.27 -129.83,312.94 -66.02,312.94 -43.71,335.25 -43.71,389.46 U1.F3@-24.2,408.97
  SIG2/PWR w4: v1(-226.17,501.08) -226.2,438.68 -148.69,361.17 -148.69,269.64 v1(-160.5,257.83)
  SIG1/PWR w4: v1(-160.5,257.83) -75.86,257.83 -28.38,305.31 73,305.31 114.1,346.41 204.65,346.41 297.24,253.82 297.24,207.68 302.96,201.96 303.86,201.96 311.82,194 v1(315,194)
  Bottom Layer w4: J1.6@314.96,60.04 314.96,114.17 321.85,121.06 321.85,152.52 315,159.37 v1(315,194)
SWCLK: J1.21 U1.A16 | length 1014.1
  Top Layer w4: v1(-172.32,658.42) -170.56,658.42 -164.1,664.88 U1.A16@-122.62,664.88 ; v1(145,168) 145,148.09 167.32,125.77 J1.21@167.32,50.2
  SIG2/PWR w4: v1(-172.32,658.42) -170.99,658.42 -164.1,665.31 -137.87,665.31 -115.23,687.94 34.55,687.94 80.76,641.73 80.76,579.81 99.24,561.33 99.24,400.45 88.51,389.71 65.87,389.71 55.05,378.89 55.05,303.1 111.15,247 111.15,201.85 v1(145,168)
SWIO: J1.23 U1.A17 | length 1023.5
  Top Layer w4: v1(-149.2,682.77) -148.3,683.67 -123.52,683.67 U1.A17@-122.62,684.57 ; v1(137.72,196.8) 137.72,181.24 131.13,174.64 131.13,145.45 147.64,128.93 J1.23@147.64,50.2
  SIG2/PWR w4: v1(-149.2,682.77) -129.2,702.77 92.51,702.77 105.32,689.96 161.61,689.96 176.8,674.77 176.8,319.77 156.93,299.89 156.93,273.09 137.72,253.89 v1(137.72,196.8)
USB0_N: J1.5 U1.T14 | length 811.3
  Top Layer w4: U1.T14@172.65,625.51 184.16,637.02 224.2,637.02 259.03,602.19 355.87,602.19 409,549.05 409,429.19 404,424.19 404,306.65 329.72,232.38 329.72,88.58 324.8,83.66 J1.5@324.8,50.2
USB0_P: J1.3 U1.T15 | length 820.6
  Top Layer w4: U1.T15@172.65,645.2 227.34,645.2 262.35,610.19 359.18,610.19 417,552.37 417,425.88 412,420.88 412,302.75 337.72,228.47 337.72,89.44 344.49,82.67 J1.3@344.49,50.2
USB1_N: J1.37 R4.1 | length 777.9
  Top Layer w4: J1.37@9.84,50.2 9.84,83.66 15.62,89.44 15.62,127.51 -2.82,145.95 -2.82,164.26 13.87,180.95 25.18,180.95 68.35,224.12 167.35,224.12 182,238.77 227.96,238.77 312.18,322.99 312.18,472.27 283.18,501.27 283.18,551.49 302.72,571.03 R4.1@302.72,575.95
USB1_P: J1.35 R5.1 | length 718.1
  Top Layer w4: J1.35@29.53,50.2 29.53,84.77 23.62,90.68 23.62,130.82 5.18,149.26 5.18,160.95 17.18,172.95 29.18,172.95 71.18,214.95 169.49,214.95 185.31,230.77 231.28,230.77 320.18,319.67 320.18,506.57 302.72,524.03 R5.1@302.72,528.95
VDD_CORE: C13.1 C14.2 C15.2 C24.2 C27.2 L2.1 U1.K6 U1.K10 U1.L11 | length 245.1
  Top Layer w4: v1(74.54,468.03) v1@74.8,467.77
  Top Layer w10: U1.K6@54.54,468.03 v1(74.54,468.03) ; U1.K10@54.54,546.77 v1(74.8,546.77) ; v1@74.23,547.34 U1.L11@74.23,566.45
  Top Layer w16: v2(-112.2,831.69) v2@-111.74,831.23 ; v2@-82.66,831.23 v2(-82.2,830.77)
  Bottom Layer w16: v2(-112.2,831.69) -111.74,831.23 -82.66,831.23 -82.11,830.68 -82.11,734.37 L2.1@-81.51,733.77 ; v1(74.8,546.77) 93.56,546.77 95.4,548.61 C13.1@95.4,551.13 ; C15.2@76.34,468.03 77.87,469.56 105.96,469.56 C27.2@107.49,468.03
  other v1: 54.8,566.68
VDD_SYS: C21.2 U1.N14 | length 27
  Top Layer w4: U1.N14@113.6,625.51 U1.N14@113.83,625.51 ; v1@132.57,606.77 v1(132.8,606.77)
  Top Layer w8: U1.N14@113.83,625.51 v1@132.57,606.77
VDD_VBAT: C20.2 D2.2 J1.72 U1.T17 | length 1573.7
  Top Layer w4: U1.T17@172.65,684.57 172.65,704.15 177.09,708.59 v1(177.09,728.3)
  SIG2/PWR w6: v1(-413.2,764.77) -386.32,791.64 -171.2,791.64 -129.32,749.77 155.62,749.77 v1(177.09,728.3)
  Bottom Layer w6: v1(-413.2,764.77) -413.2,273.77 -326.82,187.39 -326.82,128.15 -334.65,120.32 J1.72@-334.65,60.04 ; C20.2@198.1,697.77 195.15,697.77 177.09,715.83 v1(177.09,728.3) 178.96,730.16 184.39,730.16 211.18,756.95 D2.2@280.94,756.95
VDDA: C18.1 C19.2 L1.2 U1.R4 U1.R5 | length 222.1
  Top Layer w4: U1.R5@152.97,448.34 168.66,448.34 175.13,441.88 243.9,441.88 249.96,435.82 259.93,435.82 v1(260.75,434.99)
  Top Layer w10: U1.R4@152.97,428.66 U1.R5@152.97,448.34
  Bottom Layer w12: 260.1,502.77 260.28,502.59 260.28,475.77 259.44,474.93 259.44,437.32 260.75,436 v1(260.75,434.99) 260.61,434.84 260.61,414.92 C19.2@260.46,414.77
VREFO: C16.2 C17.2 TP5.1 U1.U4 | length 208
  Top Layer w6: U1.U4@192.34,428.66 241.5,428.66 262.8,407.35 ; v1@262.8,365.77 262.8,407.35 ; TP5.1@296.76,423.95 295.72,422.91 278.36,422.91 262.8,407.35
  Bottom Layer w12: C16.2@262.46,317.77 262.78,318.09 262.78,363.45 C17.2@263.1,363.77
  other v1: 262.8,364.77
pads on no net: F1.1 F2.1 F3.1 F4.1 U1.A8 U1.B7 U1.B8 U1.B15 U1.C9 U1.C10 U1.C12 U1.C13 U1.C15 U1.D7 U1.D11 U1.E7 U1.E8 U1.E10 U1.F4 U1.F6 U1.F8 U1.F10 U1.F12 U1.G13 U1.H2 U1.K12 U1.K13 U1.K16 U1.L4 U1.L13 U1.L14 U1.L16 U1.M3 U1.M6 U1.M8 U1.M10 U1.M12 U1.M14 U1.M15 U1.M16 U1.M17 U1.N4 U1.N7 U1.N8 U1.N10 U1.N11 U1.P2 U1.R3 U1.R8 U1.R9 U1.R10 U1.T8 U1.T12 U1.U6 U1.U8 U1.U10 U1.U12 U2.A2 U2.A5 U2.B1 U2.B5 U2.C5 Y1.2 Y1.4

## Polygon pours and split planes (outlines as drawn)
+3v3 on SIG1/PWR "a" (solid, remove dead copper, pour order 3): -476.45,883.81 536.35,883.81 536.35,-21.7 -476.45,-21.7
VDD_CORE on SIG1/PWR "VDD_CORE_L04_P002" (solid, remove dead copper, pour order 2): -104.42,845.42 -5.98,845.42 -5.98,664.32 131.82,664.32 131.82,450.79 -104.42,450.79
GND on SIG2/PWR "GND_L03_P004" (solid, remove dead copper, pour order 4): -573.89,-105.36 769.61,-105.36 769.61,928.1 -573.89,928.1
GND on GND2 "GND_L05_P001" (solid, remove dead copper, pour order 1): -492.2,903.77 617.8,903.77 617.8,-144.73 -492.2,-144.73
GND on GND1 "GND_L02_P000" (solid, remove dead copper, pour order 0): -490.02,946.77 -490.02,-67.96 538.98,-67.96 538.98,946.9 -490.04,946.9

## Keep-outs
Keep-Out Layer:
  the board outline again, w1

## Silkscreen, mask and mechanical layers (free items; w line width, h text height)
Top Overlay:
  rectangle: -102,725 -93,856
  rectangle: 269.69,820.87 276.05,850.87
  text "STAT" at 279.69,779.16 h40
  text "w" at -352,725 h275
  text "Δ" at -90,709.52 h205
  text "PCB-10027" at 29,226 h70
  text "2023-05-31" at 29,166 h70
  text "E" at 148.71,102.47 h40
  text "b" at -416.41,92.95 h600